# Altium PCB NB3000XN.PcbDoc (part 7 of 71)
Units mil, origin at the board's own origin, x right, y up, seen from the top; angles counter-clockwise.
Board outline 9527.56 x 6929.77 mil, 6 copper layers (Top Layer, GND+SHIELD, MidLayer1, MidLayer2, P2 - 3V3+5V0, Bottom Layer), stack 62.375 mil thick; 832 components, 1027 nets, 4655 pads, 4981 vias.
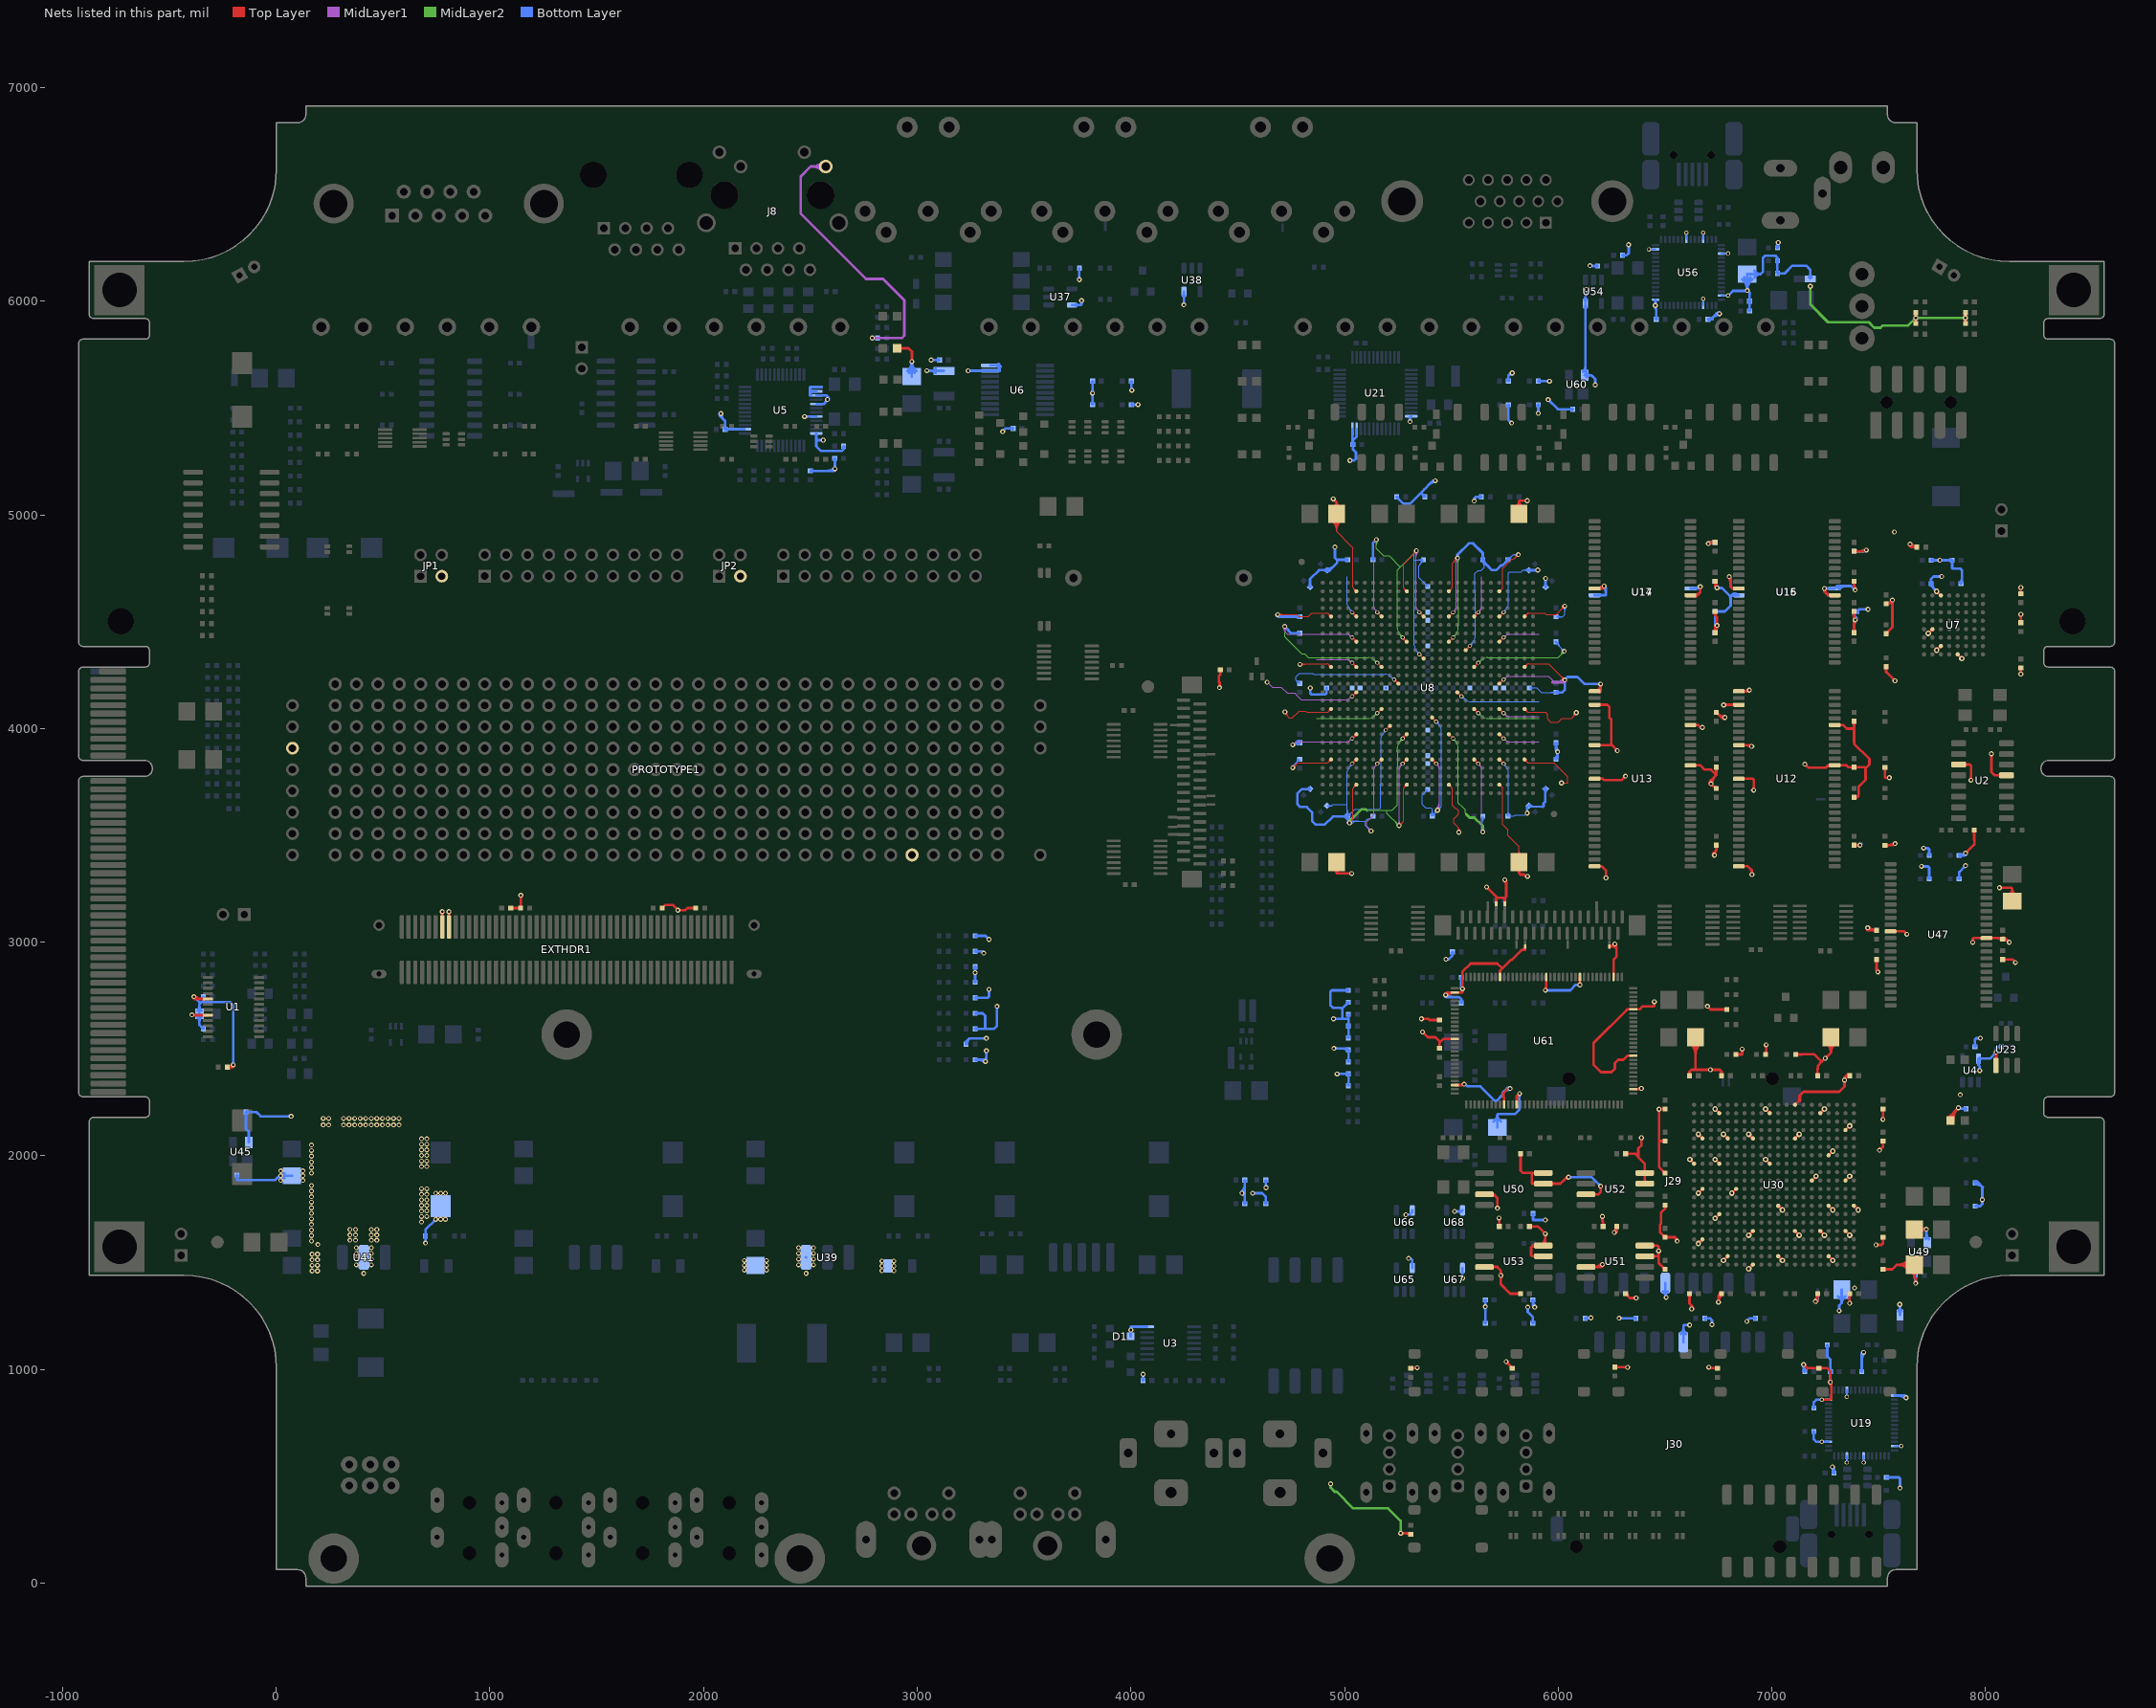
[diagram p11: the nets of this part, all layers, seen from the top]

## Via types
v1: diameter 23, hole 11.81, Top Layer to Bottom Layer, 3672 vias
v2: diameter 26, hole 11.81, Top Layer to Bottom Layer, 461 vias
v3: diameter 19, hole 11.81, Top Layer to Bottom Layer, tented both sides, 396 vias
v4: diameter 23.62, hole 11.81, Top Layer to Bottom Layer, 288 vias
v5: diameter 20, hole 11.81, Top Layer to Bottom Layer, 91 vias
v6: diameter 23, hole 11.81, Top Layer to Bottom Layer, tented both sides, 50 vias
v7: diameter 31, hole 11.81, Top Layer to Bottom Layer, 15 vias
v8: diameter 27.56, hole 11.81, Top Layer to Bottom Layer, tented both sides, 4 vias
v9: diameter 29, hole 11.81, Top Layer to Bottom Layer, 3 vias
v10: diameter 21, hole 11.81, Top Layer to Bottom Layer, 1 vias

## Nets (pads, with @x,y where several pads share a name; then routed paths per layer and width w, separated by ;. In a path a pad name is that pad's centre, name@x,y a point inside that pad or via, vN(x,y) a via of type N, cw(c..) or ccw(c..) an arc to the next point about the centre after c; other vN are vias at no path point) (continued)
3V3: (continued)
  Top Layer w12: v4(-395,2660) -393.62,2658.62 U1.8@-320,2658.62 ; v4@-390.89,2664.11 ccw(c-377.64,2677.36) -377.64,2658.62 ; v1@-389.6,2740.4 ccw(c-374.65,2755.35) -374.65,2734.21 ; v1(-385,2745) -385,2736.23 -382.98,2734.21 U1.5@-320,2734.21 ; v1@-381.11,2748.89 ccw(c-345.68,2784.32) -345.68,2734.21 ; R99.2@-231.27,2409.28 ccw(c-225.51,2423.88) -214.41,2412.78 ; R99.2@-226.86,2420.44 ccw(c-218.18,2442.41) v1(-201.48,2425.71) -212.18,2415 R99.2@-228.82,2415 ccw(c-228.82,2440.67) v1@-206.3,2428.35 ; R99.2@-225.06,2411.24 cw(c-215.98,2402.16) -215.98,2415 cw(c-215.98,2427.84) R99.2@-225.06,2418.76 ; -208.57,2415 ccw(c-208.57,2429.59) v1@-195.77,2422.59 ; v1@772.94,3139.15 cw(c763.18,3129.38) 776.99,3129.38 ; EXTHDR1.87@776.99,3071.85 v1@776.99,3142.88 ; 776.99,3130.14 cw(c789.73,3130.14) v1@780.72,3139.15 ; v1@804.44,3139.15 cw(c794.67,3129.38) 808.49,3129.38 ; EXTHDR1.85@808.49,3071.85 v1@808.49,3142.88 ; 808.49,3130.14 cw(c821.23,3130.14) v1@812.22,3139.15 ; R283.1@1097.74,3160 R234.2@1143.82,3160 1145,3161.18 v1(1145,3220) ; R283.1@1101.51,3156.24 cw(c1110.59,3147.15) 1110.59,3160 cw(c1110.58,3172.83) R283.1@1101.51,3163.76 ; R234.2@1140.06,3156.24 ccw(c1130.98,3147.16) 1130.98,3160 ccw(c1130.98,3172.84) R234.2@1140.06,3163.76 ; v1@1141.11,3216.11 cw(c1131.72,3206.72) 1145,3206.72 cw(c1158.28,3206.72) v1@1148.89,3216.11 ; R277.1@1806.34,3160.02 1821.32,3175 1855.06,3175 v1(1880.02,3150.04) 1915.04,3150.04 1925.03,3160.03 R278.2@1964.34,3160.03 ; LED3.1@2905,5780 2960,5780 2975.19,5764.81 v1(2975.19,5717.71) ; LED3.1@2914.82,5770.47 cw(c2937.36,5748.59) 2937.36,5780 cw(c2937.36,5811.41) LED3.1@2914.82,5789.53 ; v1@2971.3,5721.6 ccw(c2961.91,5730.99) 2975.19,5730.99 ccw(c2988.47,5730.99) v1@2979.08,5721.6 ; v1@4411.3,4195.6 ccw(c4401.91,4204.99) 4415.19,4204.99 ccw(c4428.47,4204.99) v1@4419.08,4195.6 ; v1@4412.02,4194.87 v1(4415.19,4191.71) 4415.19,4216.83 4412.02,4220 4412.02,4245 4418.82,4251.79 R147.1@4418.82,4275 ; R147.1@4415.06,4270.75 cw(c4405.98,4261.67) 4418.82,4261.67 cw(c4431.66,4261.67) R147.1@4422.58,4270.75 ; v1(4947.19,5075.04) 4947.19,5068.37 4948.86,5066.71 4955.52,5066.71 4962.99,5059.24 ; C276.1@4950.02,5039.68 ccw(c4941.77,5059.24) 4962.99,5059.24 ; C278.1@4951.56,3339.71 cw(c4945.6,3323.38) 4962.99,3323.38 ; C278.1@4962.99,3375 4962.99,3323.37 ; C276.1@4962.99,4982.01 C276.1@4962.99,5005 4962.99,5059.24 ; C278.1@4974.42,3339.71 ccw(c4980.38,3323.38) 4962.99,3323.38 ; C276.1@4975.97,5039.68 cw(c4984.22,5059.24) 4962.99,5059.24 ; v1@5029.64,3317.82 ccw(c5020.25,3308.43) 5020.25,3321.71 ccw(c5020.25,3334.99) v1@5029.64,3325.6 ; v1(5033.52,3321.71) 4964.66,3321.71 4962.99,3323.37 ; v1@5266.75,229.49 cw(c5276.14,220.1) 5276.14,233.37 cw(c5276.14,246.65) v1@5266.75,237.26 ; v1@5267.41,228.82 v1(5262.86,233.37) 5305.44,233.37 R107.1@5310,228.82 ; 5285.67,233.37 cw(c5285.67,204.98) R107.1@5305.75,225.06 ; R102.1@5310,1006.18 5338.19,1006.18 5340.19,1008.18 v1(5340.19,1008.37) ; R102.1@5314.25,1002.42 cw(c5323.33,993.34) 5323.33,1006.18 cw(c5323.33,1019.02) R102.1@5314.25,1009.94 ; R102.1@5321.62,1006.18 ccw(c5321.62,1026.95) v1@5336.3,1012.26 ; v1@5360.19,2641.85 5392.19,2641.85 5397.86,2636.18 R273.2@5445,2636.18 ; v1@5364.08,2637.82 cw(c5373.8,2628.09) 5373.8,2641.85 ; v1@5364.08,2645.6 ccw(c5373.13,2654.65) 5373.13,2641.85 ; v4@5365,2574.19 cw(c5365,2560.16) 5374.92,2570.08 cw(c5384.84,2580) v4@5370.81,2580 ; v4(5365,2580) 5389.88,2555.12 5425.12,2555.12 5445,2535.23 ; R273.2@5440.75,2632.42 ccw(c5431.67,2623.34) 5431.67,2636.18 ccw(c5431.67,2649.02) R273.2@5440.75,2639.94 ; R272.2@5441.24,2507.45 ccw(c5432.16,2516.53) 5445,2516.53 ccw(c5457.84,2516.53) R272.2@5448.76,2507.45 ; R272.2@5445,2503.69 5445,2535.23 ; v1@5469.26,2757.3 cw(c5487.14,2739.43) 5487.14,2764.71 ; v1(5473.86,2752.71) 5485.86,2764.71 U61.104@5516.83,2764.71 ; v1@5477.75,2748.82 cw(c5516.11,2710.46) U61.104@5516.11,2764.71 ; U61.126@5516.83,2331.35 5554.88,2331.35 v1@5560,2336.47 ; U61.115@5516.83,2547.88 5463.03,2547.88 5447.69,2532.54 5445,2535.23 ; 5537.9,2331.35 ccw(c5537.9,2357.1) v1@5556.11,2338.89 ; v1@5547.97,2785.93 ccw(c5538.58,2795.32) 5551.86,2795.32 ccw(c5565.14,2795.32) v1@5555.75,2785.93 ; v1(5560,2335) v1@5560,2336.47 ; v1@5560,2340 v1@5560,2336.47 ; U53.3@5655,1480 5715.19,1480 5731.86,1463.33 v1(5731.86,1440.19) 5731.86,1398.62 5775.48,1355 C165.2@5824.33,1355 ; U50.3@5655,1820 5698.52,1820 ; v1@5665.19,3252.87 cw(c5665.19,3239.6) 5674.58,3248.99 cw(c5683.97,3258.37) v1@5670.69,3258.37 ; v1(5665.19,3258.37) 5715.19,3208.37 ; U50.3@5684.53,1824.22 cw(c5684.53,1800.62) 5701.22,1817.31 ; U50.3@5689.37,1813.91 cw(c5696.94,1804.42) 5705.52,1813 ; U53.3@5690.03,1474.5 cw(c5703.31,1461.22) 5703.31,1480 cw(c5703.31,1498.78) U53.3@5690.03,1485.5 ; U50.3@5691.13,1815.89 cw(c5698.52,1811.3) 5698.52,1820 ; U50.3@5691.13,1824.11 ccw(c5698.52,1828.7) 5698.52,1820 ; NT36.2@5710,3180 5710,3203.52 5714.86,3208.37 5715.19,3208.37 ; v1@5711.3,1758.93 ccw(c5701.91,1768.32) 5715.19,1768.32 ccw(c5728.47,1768.32) v1@5719.08,1758.93 ; v1(5715.19,1755.04) 5715.19,1803.33 5698.52,1820 ; v1@5719.64,1705.15 cw(c5708.3,1693.81) 5724.33,1693.81 ; C158.1@5720.22,1674.11 ccw(c5710.3,1684.03) 5724.33,1684.03 ccw(c5738.36,1684.03) C158.1@5728.44,1674.11 ; C158.1@5724.33,1670 v1@5724.33,1709.04 ; U61.94@5727.48,2837.34 5727.48,2866.71 ; 5727.52,2866.71 5738.02,2877.21 ; v1@5727.97,1436.3 cw(c5718.58,1426.92) 5731.86,1426.92 cw(c5745.14,1426.92) v1@5735.75,1436.3 ; v1@5727.97,1444.08 ccw(c5718.58,1453.47) 5731.86,1453.47 ccw(c5745.14,1453.47) v1@5735.75,1444.08 ; v1@5746.3,3287.82 cw(c5720.82,3262.33) 5756.86,3262.33 ; U61.10@5747.17,2240 5747.17,2271.33 5743.5,2275 5743.5,2293.91 5764.97,2315.37 5779.52,2315.37 5779.15,2315 v1(5775,2315) ; NT35.2@5750,3180 5750,3207.18 ; v1(5750.19,3291.71) 5756.86,3285.04 5756.86,3214.04 5750,3207.18 ; v1@5756.5,1031.16 cw(c5756.5,1017.88) 5765.89,1027.27 cw(c5775.28,1036.66) v1@5762,1036.66 ; v1(5756.5,1036.66) 5785,1008.16 R103.1@5785,1006.18 ; 5773.68,1019.48 cw(c5760.38,1006.18) R103.1@5779.19,1006.18 ; C277.1@5801.08,5038.26 ccw(c5786.53,5065.04) 5817.01,5065.04 ; C279.1@5805.37,3339.79 cw(c5799.14,3323.04) 5817.01,3323.04 ; U61.13@5806.22,2240 5806.22,2278.74 v1(5819.19,2291.71) ; C279.1@5817.01,3375 5817.01,3323.04 ; C277.1@5817.01,5005 5817.01,5065.04 ; C165.2@5820.22,1350.89 ccw(c5810.3,1340.97) 5810.3,1355 ccw(c5810.3,1369.03) C165.2@5820.22,1359.11 ; C159.2@5820.22,2005.89 cw(c5810.3,1995.97) 5824.33,1995.97 cw(c5838.36,1995.97) C159.2@5828.44,2005.89 ; C159.2@5824.33,2010 5824.33,1930.67 5835,1920 5874.19,1920 ; C279.1@5828.64,3339.79 ccw(c5834.88,3323.04) 5817.01,3323.04 ; C277.1@5832.94,5038.26 cw(c5847.48,5065.04) 5817.01,5065.04 ; NT37.2@5845,2975.5 cw(c5828.52,2980.84) 5828.52,2963.52 ; NT37.2@5845,2980 5845,2965 5843.52,2963.52 5828.52,2963.52 ; v1@5848.52,3308.37 5840.52,3316.37 5823.67,3316.37 5817.01,3323.04 ; v1@5851.3,5062.82 ccw(c5841.91,5053.43) 5841.91,5066.71 ccw(c5841.91,5079.99) v1@5851.3,5070.6 ; v1(5855.19,5066.71) 5818.67,5066.71 5817.01,5065.04 ; C164.1@5865.67,1670 5905.19,1670 v1(5940,1635.19) v1@5940,1630.04 ; C164.1@5869.78,1665.89 cw(c5879.7,1655.97) 5879.7,1670 cw(c5879.7,1684.03) C164.1@5869.78,1674.11 ; 5872.25,1570.4 cw(c5886.52,1556.13) U53.8@5897.01,1573.36 ; 5879.39,1577.53 cw(c5896.69,1560.24) U53.8@5901.98,1584.12 ; 5883.04,1581.19 cw(c5894.69,1569.54) U53.8@5903.26,1583.6 ; U53.7@5895.56,1524.5 ccw(c5882.28,1511.22) 5882.28,1530 ccw(c5882.28,1548.78) U53.7@5895.56,1535.5 ; U53.8@5895.56,1574.5 ccw(c5882.28,1561.22) 5882.28,1580 ccw(c5882.28,1598.78) U53.8@5895.56,1585.5 ; U50.7@5895.56,1864.5 ccw(c5882.28,1851.22) 5882.28,1870 ccw(c5882.28,1888.78) U50.7@5895.56,1875.5 ; U50.8@5895.56,1914.5 ccw(c5882.28,1901.22) 5882.28,1920 ccw(c5882.28,1938.78) U50.8@5895.56,1925.5 ; U53.8@5925.09,1585.5 ccw(c5889.09,1621.5) 5940,1621.5 ; U53.8@5930,1580 5930.3,1580.3 U53.8@5930.59,1580.59 ; U53.7@5930.59,1530 5877.9,1530 5873.52,1534.37 5873.52,1571.67 5881.86,1580 U53.8@5930.59,1580 U53.8@5930.59,1580.59 ; U50.8@5930.59,1920 5874.19,1920 ; U53.8@5933.57,1577.02 ccw(c5918.06,1592.53) U53.8@5940,1592.53 ; v1@5934.5,1635.19 ccw(c5921.22,1635.19) 5930.61,1644.58 ccw(c5940,1653.97) v1@5940,1640.69 ; v1@5936.11,1631.3 cw(c5926.72,1621.92) 5940,1621.92 cw(c5953.28,1621.92) v1@5943.89,1631.3 ; v1@5936.3,2778.93 ccw(c5917.68,2797.55) 5944.02,2797.55 ; v1@5939.92,1630.04 v1@5940,1630.04 ; v1@5940.19,1695.96 v1@5940.19,1696.04 ; v1(5940.19,2775.04) 5944.02,2778.87 U61.83@5944.01,2837.34 ; v1(5952.77,5540) v1@5958.3,5540 ; U50.7@5965.62,1864.5 cw(c5978.9,1851.22) 5978.9,1870 cw(c5978.9,1888.78) U50.7@5965.62,1875.5 ; 6024.91,1884.76 cw(c6048.52,1861.14) v1@6048.52,1894.54 ; v1(6048.52,1900.04) 6040.19,1900.04 6010.23,1870.08 6010.23,1870 U50.7@5930.59,1870 5878.86,1870 5877.19,1871.67 5877.19,1917 5874.19,1920 ; v1@6097.97,2804.6 ccw(c6089.45,2813.11) 6101.49,2813.11 ; 6101.49,2814.86 ccw(c6116.01,2814.86) v1@6105.75,2804.6 ; U61.75@6101.49,2837.34 6101.49,2801.07 v1(6101.86,2800.71) ; U51.3@6130,1480 6202.48,1480 6206.86,1484.37 v1(6206.86,1491.71) ; U52.3@6130,1820 6188.15,1820 6198.52,1830.37 v1(6198.52,1858.37) ; U51.3@6165.03,1474.5 cw(c6178.31,1461.22) 6178.31,1480 cw(c6178.31,1498.78) U51.3@6165.03,1485.5 ; U52.3@6165.03,1814.5 cw(c6178.31,1801.22) 6178.31,1820 cw(c6178.31,1838.78) U52.3@6165.03,1825.5 ; U51.3@6165.31,1480 ccw(c6165.31,1533.25) v1@6202.97,1495.6 ; U13.27@6170.59,3355.55 6204.19,3355.55 6223.52,3336.22 v1(6223.52,3301.04) ; U13.14@6170.59,3765 6208.56,3765 6215.19,3758.37 6296.19,3758.37 v1(6315.19,3777.37) ; U13.9@6170.59,3922.48 6251.08,3922.48 ; U13.3@6170.59,4111.46 6228.77,4111.46 6240.19,4100.04 6240.19,4050.04 6248.52,4041.71 6248.52,3925.04 6251.08,3922.48 ; U13.1@6170.59,4174.45 6199.45,4174.45 ; U17.11@6170.59,4655.75 6204.23,4655.75 v1(6215.19,4666.71) ; U17.11@6175.45,4655.75 ccw(c6175.45,4706.45) v1@6211.3,4670.6 ; U13.1@6185.37,4177.32 ccw(c6155.31,4208.37) v1(6198.52,4208.37) ; U13.1@6185.56,4177.5 ccw(c6160.21,4207.45) v1@6199.45,4207.45 ; U13.1@6193.32,4168.34 ccw(c6182.12,4181.57) 6199.45,4181.57 ; U13.1@6193.71,4168.7 ccw(c6182.72,4180.05) 6198.52,4180.05 ; 6194.28,1480 ccw(c6194.28,1504.28) v1@6211.45,1487.11 ; v1@6194.64,1854.49 cw(c6185.25,1845.1) 6198.52,1845.1 cw(c6211.8,1845.1) v1@6202.41,1854.49 ; 6199.45,4192.86 ccw(c6183.01,4192.86) 6194.64,4204.49 cw(c6185.25,4195.1) 6198.52,4195.1 cw(c6211.8,4195.1) v1@6202.41,4204.49 ; v1@6202.97,1712.82 cw(c6193.58,1703.43) 6206.86,1703.43 cw(c6220.14,1703.43) v1@6210.75,1712.82 ; 6204.42,4655.75 ccw(c6204.42,4677.48) v1@6219.79,4662.11 ; C160.1@6206.56,1674.11 ccw(c6196.64,1684.03) 6210.67,1684.03 ccw(c6224.7,1684.03) C160.1@6214.78,1674.11 ; v1(6206.86,1716.71) 6206.86,1694.04 6207,1694.04 6210.67,1690.37 C160.1@6210.67,1670 ; v1@6219.64,3304.93 ccw(c6210.25,3314.32) 6223.52,3314.32 ccw(c6236.8,3314.32) v1@6227.41,3304.93 ; 6257.57,2980 ccw(c6257.57,2994.68) v1@6271.25,2989.34 ; U61.67@6258.97,2837.34 6258.98,2918.83 6273.52,2933.37 6273.52,2983.37 v1(6265.19,2991.71) 6265.19,2983.37 6261.82,2980 NT34.2@6240,2980 ccw(c6240,3001.54) v1@6260.07,2993.71 ; v1@6260.02,1646.6 ccw(c6248.05,1670) C163.2@6274.33,1670 ; v1@6261.3,2987.82 cw(c6231.79,2958.31) 6273.52,2958.31 ; R104.2@6265,1011.18 v1@6331.18,1011.18 ; v1@6265.48,1635.92 ccw(c6258.09,1650.38) 6274.33,1650.38 ; v1@6266.71,1641.71 v1(6262.52,1641.71) 6274.33,1653.51 C163.2@6274.33,1670 ; R104.2@6269.25,1007.42 cw(c6278.33,998.34) 6278.33,1011.18 cw(c6278.33,1024.02) R104.2@6269.25,1014.94 ; C163.2@6270.22,1665.89 cw(c6260.3,1655.97) 6274.33,1655.97 cw(c6288.36,1655.97) C163.2@6278.44,1665.89 ; v1@6271.36,3896.71 ccw(c6258.08,3896.71) 6267.47,3906.1 ccw(c6276.86,3915.49) v1@6276.86,3902.21 ; v1(6276.86,3896.71) 6251.08,3922.48 ; 6308.87,1011.18 cw(c6308.87,993.87) v1@6321.11,1006.11 ; v1@6309.69,3777.37 cw(c6296.41,3777.37) 6305.8,3767.99 cw(c6315.19,3758.6) v1@6315.19,3771.87 ; C161.2@6315.67,1349.19 cw(c6315.67,1335.16) 6325.59,1345.08 cw(c6335.51,1355) C161.2@6321.48,1355 ; C161.2@6315.67,1355 6335.67,1335 v4(6365,1335) ; C162.1@6315.67,2010 6361.52,2010 6375.07,1996.45 ; C162.1@6319.78,2005.89 cw(c6329.7,1995.97) 6329.7,2010 cw(c6329.7,2024.03) C162.1@6319.78,2014.11 ; U61.48@6351.71,2469.14 6324.96,2469.14 6305.86,2450.04 6281.86,2450.04 6265.19,2433.37 6265.19,2408.37 6248.52,2391.71 6200.52,2391.71 6165.19,2427.04 6165.19,2527.16 6323.71,2685.68 U61.59@6351.93,2685.68 6380.86,2685.68 6395.22,2700.04 6448.19,2700.04 6449.86,2701.71 v1(6449.86,2721.37) ; U61.40@6351.93,2311.66 v1@6385.86,2311.66 ; v4@6360.89,1330.89 ccw(c6350.97,1320.97) 6350.97,1335 ccw(c6350.97,1349.03) v4@6360.89,1339.11 ; U61.40@6367.28,2311.66 ccw(c6367.28,2337.62) v1@6385.64,2319.26 ; U52.7@6373.52,1870 U52.7@6405.59,1870 U52.8@6405.59,1920 6405.59,1962.57 6375.07,1993.08 6375.07,1996.45 ; v4@6385.89,2080.89 cw(c6375.91,2070.91) 6390.02,2070.91 ; v1@6385.86,2311.71 v1(6389.52,2315.37) ; 6390.02,2071.03 cw(c6403.97,2071.03) v4@6394.11,2080.89 ; v4(6390,2085) 6390,2075.64 6390.02,2050.21 6390.19,2050.04 6375.07,2034.93 6375.07,1996.45 ; U52.7@6400.09,1875.5 ccw(c6386.81,1888.78) 6405.59,1888.78 ccw(c6424.37,1888.78) U52.7@6411.09,1875.5 ; U52.8@6400.09,1914.5 cw(c6386.81,1901.22) 6405.59,1901.22 cw(c6424.37,1901.22) U52.8@6411.09,1914.5 ; U52.8@6400.09,1925.5 ccw(c6386.81,1938.78) 6405.59,1938.78 ccw(c6424.37,1938.78) U52.8@6411.09,1925.5 ; U51.7@6405.59,1530 6470,1530 ; U51.8@6405.59,1580 6465,1580 6470,1575 v1(6470,1555) ; U51.7@6440.62,1524.5 cw(c6453.9,1511.22) 6453.9,1530 cw(c6453.9,1548.78) U51.7@6440.62,1535.5 ; U51.8@6440.62,1574.5 cw(c6453.9,1561.22) 6453.9,1580 cw(c6453.9,1598.78) U51.8@6440.62,1585.5 ; v1@6445.97,2717.49 cw(c6436.58,2708.1) 6449.86,2708.1 cw(c6463.14,2708.1) v1@6453.75,2717.49 ; v1@6466.11,1551.11 cw(c6456.72,1541.72) 6470,1541.72 cw(c6483.28,1541.72) v1@6473.89,1551.11 ; v1@6466.11,1558.89 ccw(c6456.72,1568.28) 6470,1568.28 ccw(c6483.28,1568.28) v1@6473.89,1558.89 ; v1@6467.97,2214.49 cw(c6458.58,2205.1) 6471.86,2205.1 cw(c6485.14,2205.1) 6475.75,2214.49 cw(c6487.44,2202.79) 6487.44,2219.33 ; v1@6471.23,1555 v1(6470,1555) ; v1(6471.86,2218.37) 6471.86,2069.33 ; v1@6473.52,1552.71 v1@6473.52,1555 ; v1@6473.62,1551.38 v1(6470,1555) ; v1@6474.48,2219.33 C224.1@6500,2219.33 ; C242.1@6494.19,1469.33 ccw(c6480.16,1469.33) 6490.08,1479.25 ccw(c6500,1489.17) C242.1@6500,1475.14 ; C246.1@6494.19,1619.33 ccw(c6480.16,1619.33) 6490.08,1629.25 ccw(c6500,1639.17) C246.1@6500,1625.14 ; C245.1@6494.19,1919.33 ccw(c6480.16,1919.33) 6490.08,1929.25 ccw(c6500,1939.17) C245.1@6500,1925.14 ; C241.1@6495.89,1765.22 cw(c6485.97,1755.3) 6500,1755.3 cw(c6514.03,1755.3) C241.1@6504.11,1765.22 ; C240.1@6495.89,2065.22 ccw(c6485.97,2055.3) 6485.97,2069.33 ccw(c6485.97,2083.36) C240.1@6495.89,2073.44 ; C224.1@6495.89,2215.22 ccw(c6485.97,2205.3) 6485.97,2219.33 ccw(c6485.97,2233.36) C224.1@6495.89,2223.44 ; C245.1@6499.96,1919.37 6471.86,1947.47 6471.86,2069.33 ; C242.1@6500,1469.33 6470,1499.33 6470,1530 ; C241.1@6500,1769.33 6500,1752.71 6498.67,1751.37 6498.52,1751.37 6481.86,1734.71 6481.86,1683.37 6477.52,1679.04 6477.52,1641.71 6477.62,1641.71 C246.1@6500,1619.33 6543.48,1619.33 6543.48,1619.04 6545.81,1616.71 6549.52,1616.71 6557.19,1609.04 v1(6557.19,1600.71) ; C240.1@6500,2069.33 6471.86,2069.33 ; C246.1@6504.11,1615.22 cw(c6514.03,1605.3) 6514.03,1619.33 cw(c6514.03,1633.36) C246.1@6504.11,1623.44 ; v1@6505.1,1337.61 v1@6505.19,1337.52 ; v1@6505.19,1337.37 v1@6505.19,1337.52 ; v1(6505.19,1337.71) v1@6505.19,1337.52 ; 6545.36,1620.87 cw(c6529.33,1604.85) v1@6551.75,1601.52 ; C221.1@6610.22,1350.89 cw(c6600.3,1340.97) 6614.33,1340.97 cw(c6628.36,1340.97) C221.1@6618.44,1350.89 ; C215.1@6610.22,2379.11 ccw(c6600.3,2389.03) 6614.33,2389.03 ccw(c6628.36,2389.03) C215.1@6618.44,2379.11 ; C221.1@6614.33,1355 6614.33,1309.23 6624.52,1299.04 v1(6624.52,1283.37) ; C215.1@6614.33,2375 6614.33,2393.9 6623.33,2402.9 6645,2402.9 ; C202.1@6619.4,2527.47 cw(c6562.43,2470.5) 6642.99,2470.5 cw(c6723.55,2470.5) C202.1@6666.59,2527.47 ; U13.43@6619.41,3827.99 6665.19,3827.99 6681.86,3811.32 6681.86,3811.04 6684.52,3808.37 6715.19,3808.37 6715.19,3807.99 6740,3783.18 ; U13.49@6619.41,4016.97 6654.52,4016.97 6666.49,4005 v1(6675,4005) v1@6670.15,4005 ; U17.33@6619.41,4624.25 6652.07,4624.25 6665.19,4637.37 ; 6625.22,1298.35 cw(c6611.13,1284.26) v1@6631.01,1282.95 ; C202.1@6627.88,2535.95 cw(c6591.4,2499.47) 6642.99,2499.47 cw(c6694.58,2499.47) C202.1@6658.1,2535.95 ; U17.33@6635.81,4616.34 ccw(c6637.93,4630.83) 6648.29,4620.47 ; U17.33@6637.55,4628.21 ccw(c6642.24,4660.32) 6665.19,4637.37 ; C202.1@6642.99,2555 6642.99,2404.91 6645,2402.9 ; v1@6661.3,4660.15 cw(c6651.91,4650.76) 6665.19,4650.76 cw(c6678.47,4650.76) v1@6669.08,4660.15 ; v1(6665.19,4664.04) 6665.19,4637.37 ; v1(6698.52,2700.04) 6713.56,2685 R215.1@6788.82,2685 ; v1(6702.52,4865.71) 6708.19,4871.38 C79.1@6735,4871.38 ; v1(6704.52,1010.71) 6706.86,1010.71 6705.69,1009.54 6702.33,1006.18 6704.52,1006.18 R105.1@6745,1006.18 ; v1@6706.41,4861.82 cw(c6729.49,4838.75) C79.1@6729.49,4871.38 ; v1@6708.41,1014.6 ccw(c6728.73,1034.92) 6728.73,1006.18 ; v1@6708.49,2399.01 ccw(c6699.1,2389.62) 6699.1,2402.9 ccw(c6699.1,2416.18) v1@6708.49,2406.79 ; v1@6708.69,3741.71 cw(c6733.24,3741.71) 6715.88,3759.06 ; v1@6711.3,3745.6 ccw(c6701.91,3754.99) 6715.19,3754.99 ccw(c6728.47,3754.99) v1@6719.08,3745.6 ; v1@6715.19,3736.21 cw(c6715.19,3722.93) 6724.58,3732.32 cw(c6733.97,3741.71) 6720.69,3741.71 cw(c6774.21,3741.71) 6736.37,3779.55 ; v1@6716.27,2399.01 cw(c6725.66,2389.62) 6725.66,2402.9 cw(c6725.66,2416.18) v1@6716.27,2406.79 ; 6725.73,3731.17 ccw(c6740,3745.45) C67.1@6740,3725.26 ; v1@6726.07,3404.09 cw(c6736.99,3409.65) 6728.32,3418.32 ; C84.1@6730.89,4453.36 ccw(c6720.97,4463.29) 6735,4463.29 ccw(c6749.03,4463.28) C84.1@6739.11,4453.36 ; C83.1@6730.89,4544.51 cw(c6720.97,4534.59) 6735,4534.59 cw(c6749.03,4534.6) C83.1@6739.11,4544.51 ; C80.1@6730.89,4685.22 cw(c6720.97,4675.3) 6735,4675.3 cw(c6749.03,4675.3) C80.1@6739.11,4685.22 ; C79.1@6730.89,4867.27 ccw(c6720.97,4857.35) 6720.97,4871.38 ccw(c6720.97,4885.41) C79.1@6730.89,4875.49 ; v1(6731.86,3407.04) 6731.86,3421.86 6740,3430 ; C84.1@6735,4449.26 v1@6735,4480.23 ; C84.1@6735,4449.99 cw(c6776.24,4449.99) v1@6747.08,4479.15 ; C83.1@6735,4548.62 6735,4530.04 6743.19,4521.85 v1(6743.19,4483.04) ; C68.1@6735.89,3450.07 cw(c6725.97,3440.15) 6740,3440.15 cw(c6754.03,3440.15) C68.1@6744.11,3450.07 ; C66.1@6735.89,3814.71 cw(c6725.97,3804.79) 6740,3804.79 cw(c6754.03,3804.79) C66.1@6744.11,3814.71 ; v1@6736.76,3409.54 cw(c6752.46,3417.54) 6740,3430 ; v1@6739.3,4486.93 ccw(c6729.91,4496.32) 6743.19,4496.32 ccw(c6756.47,4496.32) v1@6747.08,4486.93 ; C68.1@6740,3454.18 6740,3430 ; C67.1@6740,3719.45 6737.45,3719.45 v1(6715.19,3741.71) 6715.19,3758.37 6740,3783.18 ; C66.1@6740,3818.82 6740,3783.18 ; C65.1@6740,4070.01 cw(c6740,4055.98) 6749.92,4065.9 cw(c6759.84,4075.82) C65.1@6745.81,4075.82 ; C65.1@6740,4075.82 6763.45,4052.37 v1(6780.52,4052.37) ; R105.1@6740.75,1002.42 ccw(c6731.67,993.34) 6731.67,1006.18 ccw(c6731.67,1019.02) R105.1@6740.75,1009.94 ; v1(6743.19,4658.37) 6735,4666.56 C80.1@6735,4689.33 ccw(c6771.34,4689.33) v1@6746.89,4662.44 ; v1@6746.11,1318.89 ccw(c6736.72,1328.28) 6750,1328.28 ccw(c6763.28,1328.28) v1@6753.89,1318.89 ; C65.1@6748.54,4067.29 ccw(c6772.99,4091.73) v1@6779.49,4057.78 ; v1@6750,1312.51 cw(c6799.07,1312.51) C237.1@6768.01,1350.5 ; v1(6750,1315) 6750,1340.67 C237.1@6764.33,1355 ; 6750,1334.73 cw(c6764.46,1334.73) C237.1@6764.37,1349.19 ; 6750,1337.83 cw(c6778.37,1337.83) C237.1@6760.41,1359.79 ; C237.1@6758.52,1355 cw(c6744.49,1355) 6754.41,1345.08 cw(c6764.33,1335.16) C237.1@6764.33,1349.19 ; C231.1@6760.22,2379.11 ccw(c6750.3,2389.03) 6764.33,2389.03 ccw(c6778.36,2389.03) C231.1@6768.44,2379.11 ; C231.1@6764.33,2375 6764.33,2395 6756.43,2402.9 v1(6712.38,2402.9) 6645,2402.9 ; 6764.55,4051.27 ccw(c6778.13,4064.86) v1@6781.75,4045.99 ; v4(6775,4110) 6776.46,4111.46 U12.3@6845.59,4111.46 ; v1@6776.64,4048.49 ccw(c6767.25,4039.1) 6767.25,4052.37 ccw(c6767.25,4065.65) v1@6776.64,4056.26 ; v4@6779.11,4105.89 cw(c6792.55,4092.45) 6792.55,4111.46 ; R215.1@6785.06,2681.24 ccw(c6775.98,2672.16) 6775.98,2685 ccw(c6775.98,2697.84) R215.1@6785.06,2688.76 ; v1@6796.64,4707.49 cw(c6771.96,4682.81) 6806.86,4682.81 ; v1(6800.52,4711.37) 6806.86,4705.04 6806.86,4664.08 6815.19,4655.75 U16.11@6845.59,4655.75 ; R264.2@6831.18,2475 6860,2475 6861.19,2476.19 v1(6861.19,2500.04) v1@6866.19,2500.04 ; R264.2@6834.94,2471.24 cw(c6844.02,2462.16) 6844.02,2475 cw(c6844.02,2487.84) R264.2@6834.94,2478.76 ; U12.27@6845.59,3355.55 6886.86,3355.55 6892.37,3350.04 6892.52,3350.04 6906.86,3335.71 v1(6906.86,3316.71) ; U12.14@6845.59,3765 6909.9,3765 6915.19,3759.71 v1(6915.19,3711.37) ; U12.9@6845.59,3922.48 6899.42,3922.48 v1(6905.19,3916.71) ; U12.1@6845.59,4174.45 6894.45,4174.45 6895,4175 v4(6895,4180) ; v1@6857.3,2496.15 cw(c6847.91,2486.76) 6861.19,2486.76 cw(c6874.47,2486.76) v1@6865.08,2496.15 ; U12.1@6867.57,4174.45 ccw(c6867.57,4207.43) v4@6890.89,4184.11 ; 6877.98,3922.48 cw(c6877.98,3889.49) v1@6901.3,3912.82 ; v1@6902.97,3320.6 ccw(c6893.58,3329.99) 6906.86,3329.99 ccw(c6920.14,3329.99) v1@6910.75,3320.6 ; v1@6911.3,3715.26 ccw(c6901.91,3724.65) 6915.19,3724.65 ccw(c6928.47,3724.65) v1@6919.08,3715.26 ; R265.2@6967.42,2479.25 ccw(c6952.68,2493.99) 6973.52,2493.99 ; v1@6969.64,2515.82 cw(c6960.25,2506.43) 6973.52,2506.43 cw(c6986.8,2506.43) v1@6977.41,2515.82 ; R265.2@6971.18,2475 6973.52,2477.34 v1(6973.52,2519.71) ; R266.2@7111.18,2475 7140.19,2475 7198.52,2475.04 7233.52,2440.04 ; R266.2@7114.94,2471.24 cw(c7124.02,2462.16) 7124.02,2475 cw(c7124.02,2487.84) R266.2@7114.94,2478.76 ; 7140.19,2291.71 7131.86,2283.37 7131.86,2258.69 7130.54,2258.69 ; v1@7148.52,1017.21 cw(c7148.52,1003.93) 7157.91,1013.32 cw(c7167.3,1022.71) v1@7154.02,1022.71 ; v1(7148.52,1022.71) 7165.05,1006.18 R106.2@7220,1006.18 7258.82,1006.18 7273.52,991.48 v1(7273.52,940.71) v1@7278.52,935.71 ; v1@7154.52,3827.87 cw(c7154.52,3814.6) 7163.91,3823.99 cw(c7173.3,3833.37) v1@7160.02,3833.37 ; v1(7154.52,3833.37) 7171.19,3816.71 7252.19,3816.71 7259.86,3824.37 7259.86,3824.66 7263.19,3827.99 U12.43@7294.41,3827.99 7349.52,3827.99 7358.52,3818.99 7358.52,3818.82 C64.1@7385,3818.82 7433.19,3818.82 7438.52,3813.48 ; v1@7199.84,1322.46 ccw(c7170.55,1355) C223.1@7214.33,1355 ; v1@7207.87,1313.54 ccw(c7194.82,1328.05) 7214.33,1328.05 ; C223.1@7210.22,1350.89 cw(c7200.3,1340.97) 7214.33,1340.97 cw(c7228.36,1340.97) C223.1@7218.44,1350.89 ; C217.1@7210.22,2379.11 ccw(c7200.3,2389.03) 7214.33,2389.03 ccw(c7228.36,2389.03) C217.1@7218.44,2379.11 ; v1@7214.33,1318.37 C223.1@7214.33,1355 ; C217.1@7214.33,2375 7214.33,2407.51 7215.19,2408.37 7215.19,2421.71 ; R106.2@7215.75,1002.42 ccw(c7206.67,993.34) 7206.67,1006.18 ccw(c7206.67,1019.02) R106.2@7215.75,1009.94 ; R106.2@7224.25,1002.42 cw(c7233.33,993.34) 7233.33,1006.18 cw(c7233.33,1019.02) R106.2@7224.25,1009.94 ; v5(7234.34,858.27) 7270.19,858.27 7278.52,866.6 v1@7278.52,935.71 ; v1(7246.19,4655.71) 7246.19,4641.58 7263.52,4624.25 U16.33@7294.41,4624.25 ; v1@7250.19,2462.21 ccw(c7250.19,2475.49) 7259.58,2466.1 ccw(c7268.97,2456.71) v1@7255.69,2456.71 ; v1@7251.37,4653.87 ccw(c7271.76,4646.62) 7256.46,4631.31 ; 7252.85,4634.92 ccw(c7270.6,4652.66) U16.33@7275.99,4628.16 ; 7256.36,3821.16 cw(c7268.02,3809.5) U12.43@7275.13,3824.38 ; C201.1@7256.74,2524.56 cw(c7225.35,2483.53) 7277.01,2483.53 ; C201.1@7264.03,2534.09 cw(c7243.93,2507.81) 7277.01,2507.81 cw(c7310.09,2507.81) C201.1@7289.99,2534.09 ; v1@7269.64,936.82 cw(c7248.17,915.36) 7278.52,915.36 ; v1@7269.64,944.6 ccw(c7260.25,953.99) 7273.52,953.99 ccw(c7286.8,953.99) v1@7277.41,944.6 ; C201.1@7277.01,2555 7277.01,2483.52 ; v1@7278.52,940.71 v1@7278.52,935.71 ; U12.49@7294.41,4016.97 7333.37,4016.97 7350.37,3999.97 7350.37,3999.86 7385,3999.86 ; C201.1@7297.28,2524.56 ccw(c7328.66,2483.53) 7277.01,2483.53 ; v1@7336.11,2351.11 cw(c7326.26,2341.26) 7340.19,2341.26 ; 7340.19,2342.18 cw(c7352.82,2342.18) v1@7343.89,2351.11 ; 7340.62,2367.1 cw(c7352.92,2354.8) C233.1@7361.47,2369.94 ; v1@7345.06,2357.15 cw(c7360.01,2363.51) 7348.52,2375 ; 7349.34,2375.82 cw(c7362.6,2362.55) C233.1@7365.18,2381.13 ; 7351.79,2378.26 cw(c7360.98,2369.07) C233.1@7367.38,2380.39 ; C239.1@7360.22,1350.89 cw(c7350.3,1340.97) 7364.33,1340.97 cw(c7378.36,1340.97) C239.1@7368.44,1350.89 ; C233.1@7360.22,2370.89 ccw(c7350.3,2360.97) 7350.3,2375 ccw(c7350.3,2389.03) C233.1@7360.22,2379.11 ; v1@7360.44,1313.74 ccw(c7351.05,1323.13) 7364.33,1323.13 ccw(c7377.61,1323.13) v1@7368.22,1313.74 ; v1(7364.33,1309.85) C239.1@7364.33,1355 ; C233.1@7364.33,2375 7348.52,2375 7340.19,2366.67 7340.19,2355 7340.19,2325.04 7315.19,2300.04 7148.44,2300.04 7128.11,2279.71 7128.11,2261.12 7130.54,2258.69 ; C64.1@7380.89,3814.71 ccw(c7370.97,3804.79) 7370.97,3818.82 ccw(c7370.97,3832.85) C64.1@7380.89,3822.93 ; C69.1@7380.89,4030.38 cw(c7370.97,4020.46) 7385,4020.46 cw(c7399.03,4020.46) C69.1@7389.11,4030.38 ; C81.1@7380.89,4453.36 ccw(c7370.97,4463.29) 7385,4463.29 ccw(c7399.03,4463.28) C81.1@7389.11,4453.36 ; C86.1@7380.89,4544.51 cw(c7370.97,4534.59) 7385,4534.59 cw(c7399.03,4534.6) C86.1@7389.11,4544.51 ; C85.1@7380.89,4685.22 cw(c7370.97,4675.3) 7385,4675.3 cw(c7399.03,4675.3) C85.1@7389.11,4685.22 ; C70.1@7385,3454.18 7406.86,3454.18 7406.86,3454.37 v1(7412.52,3454.37) ; C63.1@7385,3678.11 7398.52,3678.11 ; C69.1@7385,4034.48 7385,3999.86 ; C81.1@7385,4449.26 7385,4495.18 7390.19,4500.37 v1(7390.19,4508.71) 7385,4513.9 C86.1@7385,4548.62 ; 7385,4482.9 cw(c7416,4482.9) v1@7394.08,4504.82 ; 7385,4534.52 ccw(c7416,4534.52) v1@7394.08,4512.6 ; 7385,4674.18 ccw(c7416,4674.18) v1@7394.08,4652.26 ; C85.1@7385,4689.33 7385,4661.71 7385.19,4661.71 7390.19,4656.71 v1(7390.19,4648.37) ; C82.1@7385,4830.04 7428.19,4830.04 7433.86,4835.71 v1(7442.52,4835.71) ; C63.1@7387.6,3683.31 ccw(c7395.05,3698.25) 7406.86,3686.44 ; C70.1@7389.11,3450.07 cw(c7399.03,3440.15) 7399.03,3454.18 cw(c7399.03,3468.21) C70.1@7389.11,3458.29 ; C64.1@7389.11,3814.71 cw(c7399.03,3804.79) 7399.03,3818.82 cw(c7399.03,3832.85) C64.1@7389.11,3822.93 ; C82.1@7389.11,4825.93 cw(c7399.03,4816.01) 7399.03,4830.04 cw(c7399.03,4844.07) C82.1@7389.11,4834.15 ; C63.1@7389.22,3674.11 cw(c7398.52,3665.28) 7398.52,3678.11 ; C63.1@7389.22,3682.11 ccw(c7398.52,3690.94) 7398.52,3678.11 ; 7398.77,3454.18 ccw(c7398.77,3468.13) v1@7408.64,3458.26 ; 7399.73,3454.18 cw(c7399.73,3441.58) v1@7408.64,3450.49 ; 7415.55,4830.04 ccw(c7415.55,4862.68) v1@7438.64,4839.6 ; v1@7443.92,3062.78 ccw(c7461.07,3079.9) 7461.07,3055.67 ; v1(7448.52,3067.37) 7448.52,3057.71 7446.48,3055.67 7448.52,3055.67 C156.1@7490,3055.67 ; v1@7452.42,3071.26 ccw(c7490,3108.76) C156.1@7490,3055.67 ; 7456.75,3841.71 7456.86,3841.71 ; C155.1@7485.89,2915.22 cw(c7475.97,2905.3) 7490,2905.3 cw(c7504.03,2905.3) C155.1@7494.11,2915.22 ; C156.1@7485.89,3051.56 ccw(c7475.97,3041.64) 7475.97,3055.67 ccw(c7475.97,3069.7) C156.1@7485.89,3059.78 ; 7490,2889.4 ccw(c7525.55,2889.4) v1@7500.41,2864.26 ; C155.1@7490,2919.33 7490,2866.9 v1(7496.52,2860.37) ; v1@7491.41,1579.49 cw(c7500.8,1570.1) 7500.8,1583.37 cw(c7500.8,1596.65) v1@7491.41,1587.26 ; v1(7503.52,2026.37) 7503.67,2026.37 7520,2042.71 C234.1@7520,2069.33 ; v1@7503.52,2031.87 ccw(c7503.52,2045.5) 7513.16,2035.86 ; v1@7509.02,2026.37 cw(c7521.96,2026.37) 7512.81,2035.52 ; C220.1@7515.89,1615.22 cw(c7505.97,1605.3) 7520,1605.3 cw(c7534.03,1605.3) C220.1@7524.11,1615.22 ; C234.1@7515.89,2065.22 cw(c7505.97,2055.3) 7520,2055.3 cw(c7534.03,2055.3) C234.1@7524.11,2065.22 ; C218.1@7515.89,2215.22 cw(c7505.97,2205.3) 7520,2205.3 cw(c7534.03,2205.3) C218.1@7524.11,2215.22 ; v1@7515.97,2174.26 ccw(c7506.23,2184) 7520,2184 ; v1(7519.86,2170.37) 7520,2170.52 C218.1@7520,2219.33 ; C236.1@7520,1469.33 7563.48,1469.33 7584.15,1490 C203.1@7667.01,1490 7667.01,1433.37 ; C220.1@7520,1619.33 7520,1590 7513.37,1583.37 v1@7489.19,1583.37 ; 7520,2183.31 ccw(c7532.79,2183.31) v1@7523.75,2174.26 ; C236.1@7524.11,1465.22 cw(c7534.03,1455.3) 7534.03,1469.33 cw(c7534.03,1483.36) C236.1@7524.11,1473.44 ; R156.2@7526.24,3814.55 cw(c7517.16,3805.46) 7530,3805.46 cw(c7542.84,3805.47) R156.2@7533.76,3814.55 ; R235.2@7530,3453.66 7568.9,3453.66 7571.57,3456.33 7571.57,3456.42 v1(7576.86,3461.71) ; R156.2@7530,3818.31 7530,3769.9 7530.19,3769.71 7550,3769.71 7555.19,3769.71 7554.9,3770 v1(7550,3770) ; C60.1@7530.89,4285.22 cw(c7520.97,4275.3) 7535,4275.3 cw(c7549.03,4275.3) C60.1@7539.11,4285.22 ; R235.2@7534.25,3449.9 cw(c7543.33,3440.82) 7543.33,3453.66 cw(c7543.33,3466.51) R235.2@7534.25,3457.43 ; C60.1@7535,4289.33 7535,4265.04 7539.33,4260.71 7539.52,4260.71 v1(7576.52,4223.71) ; C59.1@7535,4444.33 7564.19,4473.52 v1(7564.19,4601.71) 7558.52,4601.71 7556.86,4600.04 7556.86,4592.66 ; C59.1@7535,4450.14 ccw(c7535,4464.17) 7544.92,4454.25 ccw(c7554.84,4444.33) C59.1@7540.81,4444.33 ; C58.1@7535,4584.33 7548.52,4584.33 ; 7536.02,3769.71 ccw(c7536.02,3783.98) v1@7546.11,3773.89 ; 7537.43,3769.71 cw(c7537.43,3757.43) v1@7546.11,3766.11 ; C58.1@7537.59,4589.53 ccw(c7545.05,4604.47) 7556.86,4592.66 ; C58.1@7539.22,4580.33 cw(c7548.52,4571.5) 7548.52,4584.33 ; C58.1@7539.22,4588.33 ccw(c7548.52,4597.16) 7548.52,4584.33 ; 7544.16,3453.66 ccw(c7544.16,3494.4) v1@7572.97,3465.6 ; 7553.59,4589.4 ccw(c7541.28,4601.71) v1@7558.69,4601.71 ; U47.11@7555.59,3050.75 7618.56,3050.75 7619.86,3049.45 7619.86,3049.37 v1(7631.86,3037.37) ; v1@7560.3,4597.82 cw(c7550.91,4588.43) 7564.19,4588.43 cw(c7577.47,4588.43) v1@7568.08,4597.82 ; v1@7571.02,4223.71 ccw(c7557.75,4223.71) 7567.14,4233.1 ccw(c7576.52,4242.49) v1@7576.52,4229.21 ; v1@7641.17,4860.24 ccw(c7658.5,4869.79) 7658.5,4850 ; C203.1@7643.41,1466.4 ccw(c7586.45,1409.44) 7586.45,1490 ccw(c7586.44,1570.56) C203.1@7643.41,1513.6 ; v1(7646.86,4863.37) 7646.86,4853.37 7650.23,4850 R159.2@7678.82,4850 cw(c7678.82,4881) v1@7651.67,4866.03 ; C203.1@7651.9,1474.89 ccw(c7615.42,1438.41) 7615.42,1490 ccw(c7615.42,1541.59) C203.1@7651.9,1505.11 ; C203.1@7652.75,1455.89 cw(c7642.1,1433.38) 7667.01,1433.38 ; C200.1@7667.01,1655 v1@7721.52,1655 ; v1@7669.64,1407.26 ccw(c7660.25,1416.65) 7673.52,1416.65 ccw(c7686.8,1416.65) v1@7677.41,1407.26 ; v4@7669.71,5917.89 cw(c7659.79,5907.97) 7673.82,5907.97 cw(c7687.85,5907.97) v4@7677.93,5917.89 ; v4@7669.71,5926.11 ccw(c7659.79,5936.03) 7673.82,5936.03 ccw(c7687.85,5936.03) v4@7677.93,5926.11 ; R282.1@7670.06,5900.59 ccw(c7660.98,5909.67) 7673.82,5909.67 ccw(c7686.66,5909.67) R282.1@7677.58,5900.59 ; R280.1@7670.06,5942.41 cw(c7660.98,5933.33) 7673.82,5933.33 cw(c7686.66,5933.33) R280.1@7677.58,5942.41 ; v1(7673.52,1403.37) 7673.52,1426.86 7667.01,1433.37 ; R282.1@7673.82,5896.33 v4(7673.82,5922) R280.1@7673.82,5946.67 ; R159.2@7675.06,4846.24 ccw(c7665.98,4837.16) 7665.98,4850 ccw(c7665.98,4862.84) R159.2@7675.06,4853.76 ; C203.1@7681.27,1455.89 ccw(c7691.91,1433.38) 7667.01,1433.38 ; C200.1@7696.73,1639.82 cw(c7721.52,1627.16) v1@7721.52,1655 ; C200.1@7696.73,1670.18 ccw(c7721.52,1682.84) v1@7721.52,1655 ; C200.1@7705.79,1655 ccw(c7705.79,1674.11) v1@7719.3,1660.6 ; v1@7721.86,1655.33 v1@7721.52,1655 ; v1@7721.86,1655.37 v1(7723.19,1656.71) ; v2@7763.52,4366.71 v2@7764.86,4368.04 ; v2@7764.52,4368.37 v2@7764.86,4368.04 ; v2(7771.26,4366.89) 7769.78,4368.37 7765.19,4368.37 v2@7764.86,4368.04 ; LED2.1@7826.24,2164.43 cw(c7855.89,2166.07) 7834.89,2187.07 ; LED2.1@7829.69,2176.85 ccw(c7822.82,2188.72) 7836.54,2188.72 ; LED2.1@7836.54,2165 7836.54,2188.72 ; LED2.1@7838.22,2165.09 cw(c7891.86,2168.06) 7853.87,2206.06 ; LED2.1@7843.38,2176.85 cw(c7850.25,2188.72) 7836.54,2188.72 ; LED2.1@7850.2,2165.76 cw(c7927.84,2170.06) v1(7872.86,2225.04) 7836.54,2188.72 ; v1@7867.36,2225.04 cw(c7854.08,2225.04) 7863.47,2215.65 cw(c7872.86,2206.26) v1@7872.86,2219.54 ; U2.3@7874.17,3831.34 7927.19,3831.34 7932.19,3826.34 7932.19,3758.71 v1(7931.86,3758.37) ; U2.3@7901.33,3825.84 cw(c7914.61,3812.56) 7914.61,3831.34 cw(c7914.61,3850.12) U2.3@7901.33,3836.84 ; v4@7901.7,5917.89 cw(c7891.78,5907.97) 7905.81,5907.97 cw(c7919.84,5907.97) v4@7909.92,5917.89 ; v4@7901.7,5926.11 ccw(c7891.78,5936.03) 7905.81,5936.03 ccw(c7919.84,5936.03) v4@7909.92,5926.11 ; R281.1@7902.05,5900.59 ccw(c7892.97,5909.67) 7905.81,5909.67 ccw(c7918.65,5909.67) R281.1@7909.57,5900.59 ; R279.1@7902.05,5942.41 cw(c7892.97,5933.33) 7905.81,5933.33 cw(c7918.65,5933.33) R279.1@7909.57,5942.41 ; R281.1@7905.81,5896.33 v4(7905.81,5922) R279.1@7905.81,5946.67 ; v1(7906.86,3416.71) 7947.52,3457.37 7947.52,3479.5 7947.32,3479.5 C35.1@7947.32,3525 ; v1@7906.86,3422.21 ccw(c7906.86,3435.49) 7916.25,3426.1 ccw(c7925.64,3416.71) v1@7912.36,3416.71 ; v1@7927.97,3762.26 ccw(c7917.78,3772.46) 7932.19,3772.46 ; 7932.19,3770.85 ccw(c7944.33,3770.85) v1@7935.75,3762.26 ; v1@7936.3,3002.93 ccw(c7926.91,3012.32) 7940.19,3012.32 ccw(c7953.47,3012.32) v1@7944.08,3002.93 ; v1(7940.19,2999.04) 7940.19,3015.37 7944.07,3019.25 U47.33@8004.41,3019.25 8075.08,3019.25 C153.1@8080,3014.33 8096.9,3014.33 v1(8111.19,3000.04) ; C35.1@7943.21,3520.89 cw(c7933.29,3510.97) 7947.32,3510.97 cw(c7961.35,3510.97) C35.1@7951.43,3520.89 ; v1@8023.64,3878.35 cw(c8014.25,3868.96) 8027.52,3868.96 cw(c8040.8,3868.96) v1@8031.41,3878.35 ; v1@8027.52,3882.04 8027.52,3796.3 8042.49,3781.34 U2.13@8098.58,3781.34 ; U23.4@8049,2423.2 8049,2464 8050.19,2465.19 v1(8050.19,2485.04) ; 8054.09,3019.25 cw(c8054.09,2988.42) C153.1@8075.89,3010.22 ; v1(8065,3255) 8120,3255 8125,3250 C36.1@8125,3192.01 ; v1@8068.89,3251.11 cw(c8078.28,3241.72) 8078.28,3255 cw(c8078.28,3268.28) v1@8068.89,3258.89 ; U2.13@8071.43,3775.84 ccw(c8058.15,3762.56) 8058.15,3781.34 ccw(c8058.15,3800.12) U2.13@8071.43,3786.84 ; C153.1@8077.07,3019.78 cw(c8083.83,3007.2) 8093.93,3017.3 ; C154.1@8080,2919.33 8125.67,2919.33 8139.9,2905.1 v1@8140,2905 ; C153.1@8080,3020.52 cw(c8080,2994.66) 8098.29,3012.95 ; C153.1@8082.75,3009.21 cw(c8091.81,2992.34) v1@8105.35,3005.88 ; C154.1@8084.11,2915.22 cw(c8094.03,2905.3) 8094.03,2919.33 cw(c8094.03,2933.36) C154.1@8084.11,2923.44 ; C153.1@8084.11,3010.22 cw(c8094.03,3000.3) 8094.03,3014.33 cw(c8094.03,3028.36) C153.1@8084.11,3018.44 ; C36.1@8108.23,3220.86 ccw(c8091.3,3250) 8125,3250 ccw(c8158.7,3250) C36.1@8141.77,3220.86 ; v4@8160.89,4259.11 ccw(c8150.97,4269.03) 8165,4269.03 ccw(c8179.03,4269.03) v4@8169.11,4259.11 ; C57.1@8160.89,4280.22 cw(c8150.97,4270.3) 8165,4270.3 cw(c8179.03,4270.3) C57.1@8169.11,4280.22 ; C56.1@8160.89,4499.78 ccw(c8150.97,4509.7) 8165,4509.7 ccw(c8179.03,4509.7) C56.1@8169.11,4499.78 ; v4@8160.89,4530.89 cw(c8150.97,4520.97) 8165,4520.97 cw(c8179.03,4520.97) v4@8169.11,4530.89 ; C55.1@8160.89,4634.78 ccw(c8150.97,4644.7) 8165,4644.7 ccw(c8179.03,4644.7) C55.1@8169.11,4634.78 ; v4@8160.89,4655.89 cw(c8150.97,4645.97) 8165,4645.97 cw(c8179.03,4645.97) v4@8169.11,4655.89 ; v4(8165,4255) C57.1@8165,4284.33 ; C56.1@8165,4495.67 v4(8165,4535) ; C55.1@8165,4630.67 v4(8165,4660) ; 5550,2764.42 5551.86,2766.27 v1(5551.86,2782.04) 5551.86,2861.71 5590.19,2900.04 5715.19,2900.04 5738.02,2877.21 ; 5550,2764.42 U61.104@5516.83,2764.42 5550,2764.42 ; 5715.19,3208.37 5751.19,3208.37 5750,3207.18 ; 5738.02,2877.21 5777.52,2916.71 5781.71,2916.71 5828.52,2963.52 ; U53.8@5930.59,1580.59 5940,1590 v1@5940,1630.04 ; v1@5940.19,1696.04 5938.19,1698.04 5936.19,1700.04 v1(5940.19,1700.04) v1@5940.19,1696.04 ; v1(6198.52,4208.37) 6198.52,4175.37 6199.45,4174.45 ; v1(6198.52,4208.37) 6199.45,4207.45 6199.45,4174.45 ; 6470,1530 v1(6470,1555) ; 7130.54,2258.69 7128.11,2258.69 7128.11,2257.37 7131.86,2257.37 7130.54,2258.69 ; 7215.19,2421.71 7233.52,2440.04 ; 7215.19,2421.71 7233.52,2440.04 ; 7233.52,2440.04 v1@7242.76,2449.28 ; 7233.52,2440.04 v1@7242.76,2449.28 ; 7240.8,2447.32 cw(c7250.19,2437.93) 7250.19,2451.21 ccw(c7250.19,2437.93) 7240.8,2447.32 ; 7240.8,2447.32 ccw(c7231.41,2456.71) 7244.69,2456.71 cw(c7231.41,2456.71) 7240.8,2447.32 ; v1@7242.76,2449.28 v1(7250.19,2456.71) ; v1@7242.76,2449.28 v1(7250.19,2456.71) ; v1(7250.19,2456.71) 7277.01,2483.52 ; 7385,3999.86 7385,3936.37 7385.67,3935.71 7385.86,3935.71 7385.86,3928.71 7456.86,3857.71 7456.86,3841.71 ; 7398.52,3678.11 7406.86,3686.44 ; 7406.86,3686.44 7406.86,3728.71 7438.52,3760.37 7438.52,3813.48 ; 7438.52,3813.48 7456.86,3831.82 7456.86,3841.71 ; v1@7489.19,1583.37 7489.19,1581.71 v1(7487.52,1583.37) v1@7489.19,1583.37 ; 7548.52,4584.33 7556.86,4592.66 ; R234.2@1140.06,3164.25 ccw(c1128.13,3176.18) 1145,3176.18 cw(c1128.13,3176.18) R234.2@1140.06,3164.25
  MidLayer1 w4: v1(4637.88,4216.78) 4640.37,4216.78 4662.86,4194.29 4704.29,4194.29 4733.04,4165.54 4767.65,4165.54 4773.69,4159.5 4798.07,4135.12 4855.26,4135.12 4860,4135.12 4870,4135.12 4918.62,4135.12 5012.16,4135.12 ccw(c5012.16,4149.17) 5022.09,4139.24 ; v1@4713.47,4471.66 cw(c4697.26,4455.44) 4720.19,4455.44 cw(c4743.13,4455.44) v1@4726.91,4471.66 ; v1@4716.3,4474.49 cw(c4706.91,4465.1) 4720.19,4465.1 cw(c4733.47,4465.1) v1@4724.08,4474.49 ; v1(4720.19,4478.37) 4720.19,4453.37 4731.84,4441.73 4855.26,4441.73 4860,4441.73 4870,4441.73 4918.62,4441.73 5012.16,4441.73 cw(c5012.16,4427.68) 5022.09,4437.61 ; v1(4757.52,3924.04) 4771.76,3938.27 4860,3938.27 4870,3938.27 4918.62,3938.27 5012.16,3938.27 ccw(c5012.16,3952.32) 5022.09,3942.39 ; 4870,4323.62 4918.62,4323.62 5012.16,4323.62 cw(c5012.16,4309.57) 5022.09,4319.5 ; v3@5028.2,3954.43 cw(c5010.16,3956.01) 5021.8,3942.14 cw(c5033.44,3928.27) v3@5035.02,3946.31 ; v3@5028.2,4151.28 cw(c5010.16,4152.86) 5021.8,4138.99 cw(c5033.44,4125.12) v3@5035.02,4143.16 ; v3@5028.2,4307.46 ccw(c5010.16,4305.88) 5021.8,4319.75 ccw(c5033.44,4333.62) v3@5035.02,4315.58 ; v3@5028.2,4425.57 ccw(c5010.16,4423.99) 5021.8,4437.86 ccw(c5033.44,4451.73) v3@5035.02,4433.69 ; v1@5115.02,3520.71 ccw(c5092.09,3520.71) 5108.31,3536.92 ccw(c5124.52,3553.14) v1@5124.52,3530.21 ; v1@5119.02,3520.71 ccw(c5105.75,3520.71) 5115.13,3530.1 ccw(c5124.52,3539.49) v1@5124.52,3526.21 ; v1(5124.52,3520.71) 5104.19,3541.04 5104.19,3563.04 5138.27,3597.12 5138.27,3660 5138.27,3670 5138.27,3718.62 5138.27,3812.16 cw(c5152.32,3812.16) 5142.39,3822.09 ; 5138.27,3643.37 5138.27,3655.26 ; 5142.39,4557.91 cw(c5152.32,4567.84) 5138.27,4567.84 5138.27,4661.38 5138.27,4710 5138.27,4720 5138.27,4724.74 5138.27,4873.12 v1(5149.52,4884.37) ; v3@5146.31,3835.02 cw(c5128.27,3833.44) 5142.14,3821.8 cw(c5156.01,3810.16) v3@5154.43,3828.2 ; v3@5146.31,4544.98 ccw(c5128.27,4546.56) 5142.14,4558.2 ccw(c5156.01,4569.84) v3@5154.43,4551.8 ; v1@5248.81,3552.09 ccw(c5230.52,3570.38) 5256.38,3570.38 ; v1@5251.64,3549.26 ccw(c5240.17,3560.72) 5256.38,3560.72 ; v1@5256.38,3546.23 5256.38,3655.26 5256.38,3660 5256.38,3670 5256.38,3718.62 5256.38,3812.16 cw(c5270.43,3812.16) 5260.5,3822.09 ; 5256.38,3566.24 ccw(c5276.39,3566.24) v1@5262.24,3552.09 ; v3@5264.42,3835.02 cw(c5246.38,3833.44) 5260.25,3821.8 cw(c5274.12,3810.16) v3@5272.54,3828.2 ; v1@5329.95,4825.78 cw(c5317.47,4813.3) 5335.12,4813.3 ; 5335.12,4581.77 5335.12,4567.84 ; 5335.12,4805.83 cw(c5363.34,4805.83) v1@5343.39,4825.78 ; 5335.12,4815.49 cw(c5353.68,4815.49) v1@5340.56,4828.61 ; 5339.24,4557.91 cw(c5349.17,4567.84) 5335.12,4567.84 ; v1@5339.52,4833.37 5337.54,4833.37 v1(5336.67,4832.5) 5335.12,4830.95 5335.12,4724.74 5335.12,4720 5335.12,4710 5335.12,4567.84 ; v3@5343.16,4544.98 ccw(c5325.12,4546.56) 5338.99,4558.2 ccw(c5352.86,4569.84) v3@5351.28,4551.8 ; v3@5428.72,3828.2 cw(c5427.14,3810.16) 5441.01,3821.8 cw(c5454.88,3833.44) v3@5436.84,3835.02 ; v1@5429.22,3625.14 ccw(c5398.26,3660) 5444.88,3660 ; v1@5431.87,3622.15 ccw(c5406.17,3651.1) 5444.88,3651.1 ; v1@5434.53,3619.16 ccw(c5414.07,3642.19) 5444.88,3642.19 ; v1(5435.52,3618.04) 5444.88,3627.39 5444.88,3660 5444.88,3670 5444.88,3812.16 ; v1@5437.18,3616.17 ccw(c5421.98,3633.29) 5444.88,3633.29 ; 5440.76,3822.09 cw(c5430.83,3812.16) 5444.88,3812.16 ; 5444.88,3798.23 5444.88,3812.16 ; v3@5507.46,4551.8 ccw(c5505.88,4569.84) 5519.75,4558.2 ccw(c5533.62,4546.56) v3@5515.58,4544.98 ; 5519.5,4557.91 ccw(c5509.57,4567.84) 5523.62,4567.84 5523.62,4661.38 5523.62,4710 5523.62,4720 5523.62,4724.74 ; v1@5523.52,4793.04 v1@5523.62,4793.13 ; 5523.62,4725.04 v1@5523.62,4793.13 ; v3@5625.57,3828.2 cw(c5623.99,3810.16) 5637.86,3821.8 cw(c5651.73,3833.44) v3@5633.69,3835.02 ; v3@5625.57,4551.8 ccw(c5623.99,4569.84) 5637.86,4558.2 ccw(c5651.73,4546.56) v3@5633.69,4544.98 ; 5637.61,3822.09 cw(c5627.68,3812.16) 5641.73,3812.16 5641.73,3718.62 5641.73,3670 5641.73,3660 5641.73,3655.26 ; 5637.61,4557.91 ccw(c5627.68,4567.84) 5641.73,4567.84 5641.73,4661.38 5641.73,4710 ; 5641.73,3658.37 5641.73,3521.5 v1(5647.19,3516.04) ; v3@5744.98,3946.31 cw(c5746.56,3928.27) 5758.2,3942.14 cw(c5769.84,3956.01) v3@5751.8,3954.43 ; v3@5744.98,4064.42 cw(c5746.56,4046.38) 5758.2,4060.25 cw(c5769.84,4074.12) v3@5751.8,4072.54 ; v3@5744.98,4236.84 ccw(c5746.56,4254.88) 5758.2,4241.01 ccw(c5769.84,4227.14) v3@5751.8,4228.72 ; v3@5744.98,4433.69 ccw(c5746.56,4451.73) 5758.2,4437.86 ccw(c5769.84,4423.99) v3@5751.8,4425.57 ; 5757.91,3942.39 ccw(c5767.84,3952.32) 5767.84,3938.27 5861.38,3938.27 5910,3938.27 ; 5757.91,4060.5 ccw(c5767.84,4070.43) 5767.84,4056.38 5861.38,4056.38 5910,4056.38 ; 5757.91,4240.76 cw(c5767.84,4230.83) 5767.84,4244.88 5861.38,4244.88 5910,4244.88 5920,4244.88 5955.12,4244.88 5980,4220 ; 5757.91,4437.61 cw(c5767.84,4427.68) 5767.84,4441.73 5861.38,4441.73 5910,4441.73 ; v1@5523.62,4793.14 v1(5528.86,4798.37) v1@5523.62,4793.13
  MidLayer1 w12: J8.12@2553.71,6612.26 ccw(c2509.51,6568.06) 2509.51,6630.56 ccw(c2509.51,6693.07) J8.12@2553.71,6648.87 ; J8.12@2562.19,6620.74 ccw(c2538.48,6597.03) 2538.48,6630.56 ccw(c2538.48,6664.09) J8.12@2562.19,6640.38 ; J8.12@2572.02,6630.56 2500.56,6630.56 2455,6585 2455,6410 2760,6105 2840,6105 2940,6005 2940,5840 2928,5828 v1(2789.7,5828) ; v1@2793.59,5824.11 cw(c2802.98,5814.72) 2802.98,5828 cw(c2802.98,5841.28) v1@2793.59,5831.89 ; v1@5899.67,4741.37 v1@5900,4741.71 ; 5973.52,4216.71 6019.52,4216.71 v1(6030.52,4227.71) ; 5990.69,4216.71 ccw(c5990.69,4267.54) v1@6026.64,4231.6 ; 6019.66,4216.71 ccw(c6019.66,4238.57) v1@6035.12,4223.11 ; v1@6906.86,3711.37 v1(6915.19,3711.37) ; v1(7246.19,4655.71) v1@7248.52,4658.04 ; v1(7550,3770) 7554.9,3770 7555.19,3769.71 v1@7555.19,3770
  MidLayer2 w4: v1@4713.47,4471.66 cw(c4697.26,4455.44) 4720.19,4455.44 cw(c4743.13,4455.44) v1@4726.91,4471.66 ; v1@4716.3,4474.49 cw(c4706.91,4465.1) 4720.19,4465.1 cw(c4733.47,4465.1) v1@4724.08,4474.49 ; v1(4720.19,4478.37) 4720.19,4428.37 4798.52,4350.04 4813.51,4350.04 4831.58,4331.97 4860,4331.97 4870,4331.97 4997.36,4331.97 5016.78,4331.97 5090.9,4331.97 5110.4,4331.97 cw(c5110.4,4290.24) 5139.91,4319.75 ; 4870,4048.03 4997.36,4048.03 5016.78,4048.03 5090.9,4048.03 5110.4,4048.03 ccw(c5110.4,4089.76) 5139.91,4060.25 ; 5105.19,3616.71 5198.52,3616.71 ; v1@5142.81,4877.66 cw(c5126.59,4861.44) 5149.52,4861.44 cw(c5172.46,4861.44) v1@5156.24,4877.66 ; v1@5145.64,4880.49 cw(c5136.25,4871.1) 5149.52,4871.1 cw(c5162.8,4871.1) v1@5153.41,4880.49 ; v3@5146.31,4072.54 cw(c5128.27,4074.12) 5139.91,4060.25 ; v3@5146.31,4307.46 ccw(c5128.27,4305.88) 5139.91,4319.75 ; v1(5149.52,4884.37) 5149.52,4841.71 5182.86,4808.37 5209.19,4808.37 5261.86,4755.71 ; v3@5153.13,4064.42 ccw(c5151.55,4046.38) 5139.91,4060.25 ; v3@5153.13,4315.58 cw(c5151.55,4333.62) 5139.91,4319.75 ; v1@5246.02,3545.37 ccw(c5223.09,3545.37) 5239.31,3561.59 ccw(c5255.52,3577.81) v1@5255.52,3554.87 ; 5248.03,3655.26 5248.03,3658.37 ; v1@5250.02,3545.37 ccw(c5236.75,3545.37) 5246.14,3554.76 ccw(c5255.52,3564.15) v1@5255.52,3550.87 ; v1(5255.52,3545.37) 5198.52,3602.37 5198.52,3616.71 ; v3@5264.42,3953.13 cw(c5246.38,3951.55) 5260.25,3939.91 ; v3@5264.42,4426.87 ccw(c5246.38,4428.45) 5260.25,4440.09 ; v3@5272.54,3946.31 ccw(c5274.12,3928.27) 5260.25,3939.91 ; v3@5272.54,4433.69 cw(c5274.12,4451.73) 5260.25,4440.09 ; 5319.05,4812.9 ccw(c5299.45,4832.5) v1@5327.17,4832.5 ; 5323.83,4817.68 cw(c5336.67,4804.84) v1@5336.67,4823 ; 5325.88,4819.73 ccw(c5313.11,4832.5) v1@5331.17,4832.5 ; v1(5336.67,4832.5) 5337.54,4833.37 5339.52,4833.37 5261.86,4755.71 ; v3@5507.46,3946.31 cw(c5505.88,3928.27) 5519.75,3939.91 ; v3@5507.46,4433.69 ccw(c5505.88,4451.73) 5519.75,4440.09 ; v3@5515.58,3953.13 ccw(c5533.62,3951.55) 5519.75,3939.91 ; v3@5515.58,4426.87 cw(c5533.62,4428.45) 5519.75,4440.09 ; v1@5522.14,4791.66 cw(c5498.4,4767.92) 5531.97,4767.92 ; v1@5524.97,4794.49 cw(c5508.06,4777.57) 5531.97,4777.57 ; v1@5527.8,4797.31 cw(c5517.71,4787.23) 5531.97,4787.23 ; v1(5528.86,4798.37) 5531.97,4795.26 5531.97,4724.74 5531.97,4720 5531.97,4710 5531.97,4582.64 5531.97,4563.22 5531.97,4489.1 5531.97,4469.6 cw(c5490.24,4469.6) 5519.75,4440.09 ; 5531.97,4782.96 cw(c5544.27,4782.96) v1@5535.57,4791.66 ; 5569.86,3599.04 5565.19,3603.71 5565.19,3619.02 5551.12,3633.1 5531.97,3652.24 5531.97,3660 5531.97,3670 5531.97,3797.36 5531.97,3816.78 5531.97,3890.9 5531.97,3910.4 ccw(c5490.24,3910.4) 5519.75,3939.91 ; v3@5626.87,4064.42 cw(c5628.45,4046.38) 5640.09,4060.25 ; v3@5626.87,4315.58 ccw(c5628.45,4333.62) 5640.09,4319.75 ; v3@5633.69,4072.54 ccw(c5651.73,4074.12) 5640.09,4060.25 ; v3@5633.69,4307.46 cw(c5651.73,4305.88) 5640.09,4319.75 ; 5910,4048.03 5782.64,4048.03 5763.22,4048.03 5689.1,4048.03 5669.6,4048.03 cw(c5669.6,4089.76) 5640.09,4060.25 ; v1@6019.02,4361.71 cw(c5996.09,4361.71) 6012.31,4345.49 cw(c6028.52,4329.27) v1@6028.52,4352.21 ; v1@6023.02,4361.71 cw(c6009.75,4361.71) 6019.14,4352.32 cw(c6028.52,4342.93) v1@6028.52,4356.21 ; v1(6028.52,4361.71) 5998.79,4331.97 5920,4331.97 5910,4331.97 5782.64,4331.97 5763.22,4331.97 5689.1,4331.97 5669.6,4331.97 ccw(c5669.6,4290.24) 5640.09,4319.75 ; 5198.52,3616.71 5221.71,3616.71 5248.03,3643.03 5248.03,3658.37 ; 5248.03,3658.37 5248.03,3660 5248.03,3670 5248.03,3797.36 5248.03,3816.78 5248.03,3890.9 5248.03,3910.4 cw(c5289.76,3910.4) 5260.25,3939.91 ; 5260.25,4440.09 cw(c5289.76,4469.6) 5248.03,4469.6 5248.03,4489.1 5248.03,4563.22 5248.03,4582.64 5248.03,4710 5248.03,4720 5248.03,4724.74 5248.03,4741.88 5261.86,4755.71
  MidLayer2 w12: v4(4935,465) 4935,446.97 4954.16,427.81 4963.33,427.81 5041.14,350 5090,350 5203.97,350 5262.86,291.11 v1(5262.86,233.37) ; v1(4955,4850) 4955.56,4850 v1@4959.52,4846.04 ; v1(5023.52,3558.37) 5023.52,3566.71 5078.86,3622.04 5099.86,3622.04 5105.19,3616.71 ; v1@5029.02,3558.37 cw(c5062.42,3558.37) 5038.81,3581.99 ; v1@5258.97,237.26 ccw(c5249.58,246.65) 5262.86,246.65 ccw(c5276.14,246.65) v1@5266.75,237.26 ; 5569.86,3599.04 5585.52,3583.37 5607.86,3583.37 5647.19,3544.04 v1(5647.19,3516.04) ; v1@5643.3,3519.93 ccw(c5633.91,3529.32) 5647.19,3529.32 ccw(c5660.47,3529.32) v1@5651.08,3519.93 ; v1(6389.52,2315.37) v1@6390.19,2315.37 ; v1(6905.19,3916.71) v1@6913.52,3916.71 ; v1(7180,6070) 7180,5985 7263,5902 7454,5902 7480,5876 7509,5876 7520,5887 7638.82,5887 v4(7673.82,5922) v4(7905.81,5922) v4@7907,5922 ; v1(7283.86,544.37) v1@7286.52,541.71 ; v1@7600,440.23 v1(7600,445) ; v5@7606.86,641.73 v5@7606.86,642.71 ; v4@7668.01,5922 cw(c7653.98,5922) 7663.9,5912.08 cw(c7673.82,5902.16) v4@7673.82,5916.19 ; v4@7677.93,5917.89 cw(c7687.85,5907.97) 7687.85,5922 cw(c7687.85,5936.03) v4@7677.93,5926.11 ; v4@7901.7,5917.89 ccw(c7891.78,5907.97) 7891.78,5922 ccw(c7891.78,5936.03) v4@7901.7,5926.11